# Altium PCB End-Device-v1.0.PcbDoc (part 3 of 4)
Units mil, origin at the board's own origin, x right, y up, seen from the top; angles counter-clockwise.
Board outline 1968.5 x 2440.08 mil, 4 copper layers (Top Layer, Ground, Power, Bottom Layer), stack 61.654 mil thick; 125 components, 76 nets, 388 pads, 715 vias.
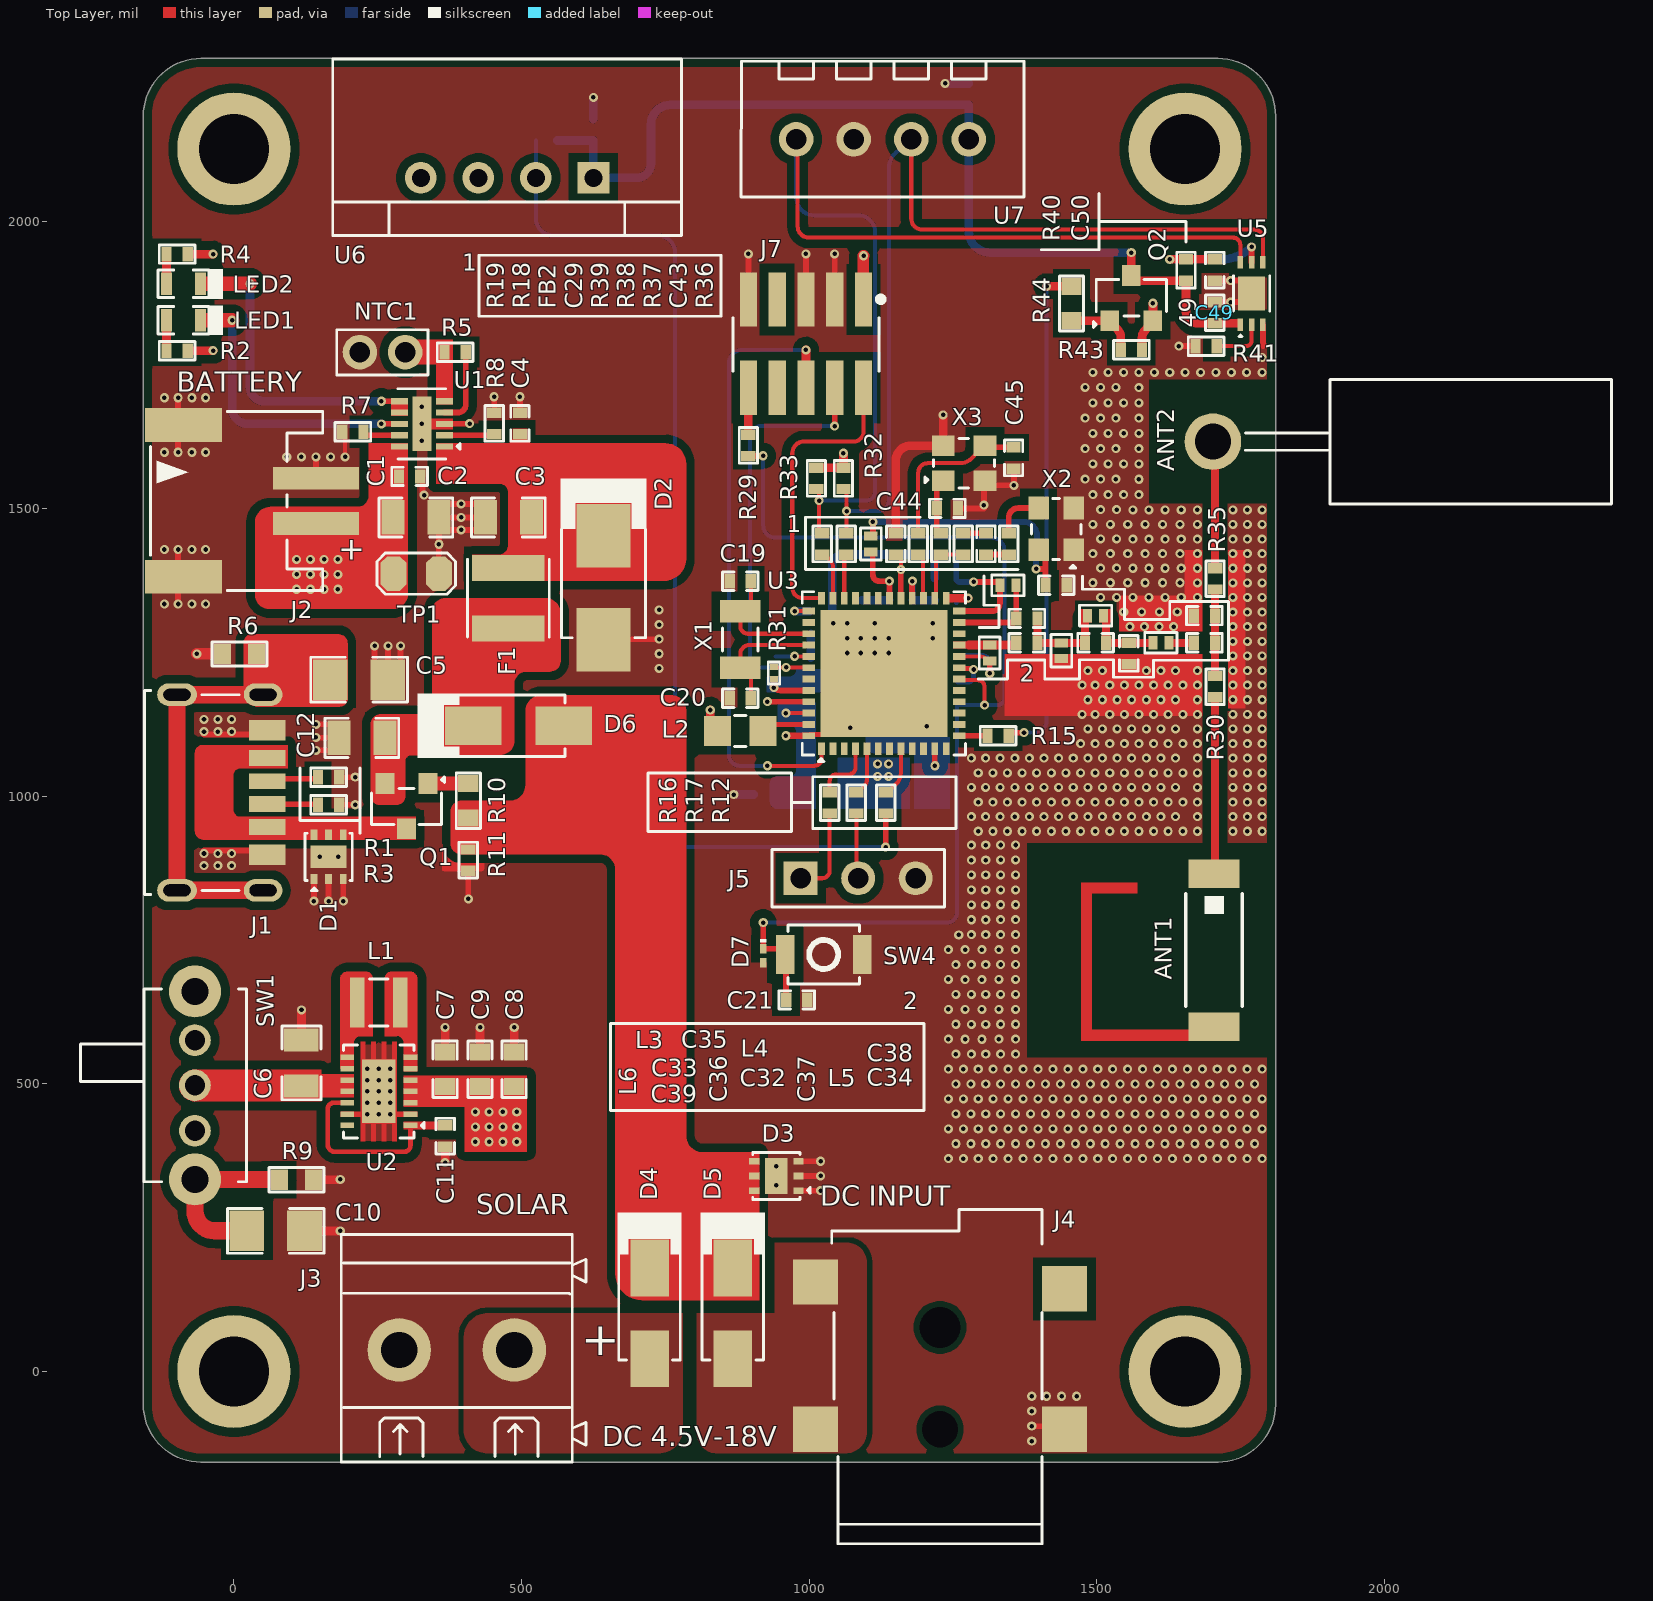
[diagram p0: Top Layer view]

## Part data (continued)
R40 R43: library part RC0402FR-071KL, "RES 1K OHM 1% 1/16W 0402", Case Code (Imperial)=0402, Case Code (Metric)=1005, LCSC Part Number=C106235, Manufacturer=Yageo, Max Operating Temperature=155°C, Max Power Dissipation=63mW, Min Operating Temperature=-55°C, Power Rating=62.5mW, Resistance=1kR, Resistance Tolerance=1%, Resistor Type="Thick Film", Temperature Coefficient=100ppm/°C, Voltage Rating=50V, Case/Package=0402, Category="Chip SMD Resistors", ComponentLink1Description=https://datasheet.ciiva.com/11819/0900766b80c66297-11819477.pdf?src-supplier=RSComponents, ComponentLink1URL=https://datasheet.ciiva.com/11819/0900766b80c66297-11819477.pdf?src-supplier=RSComponents, ComponentLink2Description=https://datasheet.ciiva.com/7983/1018594-7983502.pdf?src-supplier=Element14, ComponentLink2URL=https://datasheet.ciiva.com/7983/1018594-7983502.pdf?src-supplier=Element14, ComponentLink3Description=https://datasheet.ciiva.com/22747/1018594-22747513.pdf?src-supplier=Element14, ComponentLink3URL=https://datasheet.ciiva.com/22747/1018594-22747513.pdf?src-supplier=Element14, ComponentLink4Description=https://datasheet.ciiva.com/12666/pyu-rc0402-51-rohs-l-6-r-12666741.pdf?src-supplier=Mouser, ComponentLink4URL=https://datasheet.ciiva.com/12666/pyu-rc0402-51-rohs-l-6-r-12666741.pdf?src-supplier=Mouser, ComponentLink5Description=https://datasheet.ciiva.com/7849/1018594-7849869.pdf?src-supplier=Element14, ComponentLink5URL=https://datasheet.ciiva.com/7849/1018594-7849869.pdf?src-supplier=Element14, ComponentLink6Description=https://datasheet.ciiva.com/7849/1018594-7849871.pdf?src-supplier=Element14, ComponentLink6URL=https://datasheet.ciiva.com/7849/1018594-7849871.pdf?src-supplier=Element14, ComponentLink7Description=https://datasheet.ciiva.com/17063/pyu-rc0402-51-rohs-l-6-r-17063193.pdf?src-supplier=Future+Electronics, ComponentLink7URL=https://datasheet.ciiva.com/17063/pyu-rc0402-51-rohs-l-6-r-17063193.pdf?src-supplier=Future+Electronics, Construction=Rectangular, Depth=0.5mm, Features="Moisture Resistant", Height=0.32mm, Item Type=Resistor, Lead Free="Lead Free", Length=1mm, Manufacturer Part Number=RC0402FR-071KL, Military Standard=Not, Number of Pins=2, Number of Terminations=2, Packaging="Tape and Reel", Pricing 1="10000=0.00085, 20000=0.00087, 40000=0.00084, 60000=0.00083, 80000=0.00079, 100000=0.00078, 1000000=0.00076 (USD)", Reach SVHC Compliant=Yes, RoHS=Yes, RoHS Compliant=Yes, Series=RC, Size Code=0402, Stock 1=13030000, Supplier 1=Avnet, Supplier Part Number 1=RC0402FR-071KL, Technology="THICK FILM", Termination=SMD/SMT, Tolerance=1%, Voltage Rating (DC)=50V, Width=0.5mm
SW1: "Lying 1A SPDT 9.6mm 8.6mm 24V 3.6mm Black PCPin 10000 Rectangular columnar -25℃~+70℃ Plugin Slide Switches ROHS", LCSC Part Number=C2848877, Manufacturer=G-Switch, Package=Custom, ComponentLink1Description=LCSC, ComponentLink1URL=https://www.lcsc.com/product-detail/Slide-Switches_G-Switch-SK-12D29-G060_C2848877.html, Item Type="Slide Switch", Manufacturer Part Number=SK-12D29-G060
SW4: "SWITCH TACTILE SPST-NO 0.05A 12V", Contact Current Rating=50mA, Contact Resistance=100mR, Insulation Resistance=100MR, LCSC Part Number=C231329, Manufacturer=Omron, Max Operating Temperature=70°C, Max Voltage Rating (DC)=12V, Min Operating Temperature=-25°C, Operating Force=1.5N, Package Quantity=1, Ratings="Dust Proof,IP40", Supplier Part Number 1=SW1020DKR-ND, Actuator Length=0.4mm, Actuator Type=Standard, ComponentLink1Description=http://www.farnell.com/datasheets/60838.pdf?src-supplier=Farnell, ComponentLink1URL=http://www.farnell.com/datasheets/60838.pdf?src-supplier=Farnell, ComponentLink2Description=http://www.farnell.com/datasheets/60838.pdf?src-supplier=Element14, ComponentLink2URL=http://www.farnell.com/datasheets/60838.pdf?src-supplier=Element14, ComponentLink3Description=https://omronfs.omron.com/en_US/ecb/products/pdf/en-b3u.pdf?src-supplier=Digi-Key, ComponentLink3URL=https://omronfs.omron.com/en_US/ecb/products/pdf/en-b3u.pdf?src-supplier=Digi-Key, ComponentLink4Description=http://www.omron.com/ecb/products/pdf/en-b3u.pdf?src-supplier=Digi-Key, ComponentLink4URL=http://www.omron.com/ecb/products/pdf/en-b3u.pdf?src-supplier=Digi-Key, ComponentLink5Description=https://www.distrelec.biz/Web/Downloads/he/et/B3U_eng_datasheet.pdf?mime=application%2Fpdf&src-supplier=Distrelec, ComponentLink5URL=https://www.distrelec.biz/Web/Downloads/he/et/B3U_eng_datasheet.pdf?mime=application%2Fpdf&src-supplier=Distrelec, ComponentLink6Description=http://www.onlinecomponents.com/productFiles/mf-OM/en-b3u.pdf?src-supplier=Onlinecomponents.com, ComponentLink6URL=http://www.onlinecomponents.com/productFiles/mf-OM/en-b3u.pdf?src-supplier=Onlinecomponents.com, ComponentLink7Description=https://www.verical.com/server-webapp/html/getDatasheet?partID=552554&src-supplier=Verical, ComponentLink7URL=https://www.verical.com/server-webapp/html/getDatasheet?partID=552554&src-supplier=Verical, ComponentLink8Description=http://www.farnell.com/datasheets/1685550.pdf?src-supplier=Element14, ComponentLink8URL=http://www.farnell.com/datasheets/1685550.pdf?src-supplier=Element14, ComponentLink9Description=http://www.farnell.com/datasheets/2610940.pdf?src-supplier=Farnell, ComponentLink9URL=http://www.farnell.com/datasheets/2610940.pdf?src-supplier=Farnell, ComponentLink10Description=https://www.alliedelec.com/m/d/4c8a9ef82804fc3c241a13c1e298fd73.pdf?src-supplier=Allied+Electronics, ComponentLink10URL=https://www.alliedelec.com/m/d/4c8a9ef82804fc3c241a13c1e298fd73.pdf?src-supplier=Allied+Electronics, Contact Material=Silver, Current Rating=50mA, Depth=2.5mm, Electrical Life=200000Cycles, Height=1.2mm, Illumination Type=Non-Illuminated,Illuminated, Item Type=Switch, Lead Free="Lead Free", Length=4mm, Manufacturer Part Number=B3U-1000P, Max Current Rating=50mA, Mechanical Life=200000Cycles, Mount="Surface Mount", Orientation=Straight, Packaging="Tape and Reel", Pricing 1="1=1, 10=0.961, 25=0.9064, 50=0.7976, 100=0.7251, 250=0.68888, 500=0.67074, 1000=0.52571 (USD)", REACH SVHC=Unknown, Stock 1=116454, Supplier 1=Digi-Key, Switch Function=Off-Mom, Switch Travel=0.15mm, Termination=SMD/SMT, Throw Configuration=SPST, Voltage Rating (DC)=12V, Weight=0.000776oz, Width=3mm
TP1: "Wire Connecting Pad", Item Type="Test Point", Manufacturer Part Number="2 Test Pad"
U1: "IC BATT CHG LI-ION 1CELL 10WSON", LCSC Part Number=C524795, Manufacturer="Texas Instruments", ComponentLink1Description=https://datasheet.ciiva.com/4874/slusa76a-128668-4874253.pdf?src-supplier=Mouser, ComponentLink1URL=https://datasheet.ciiva.com/4874/slusa76a-128668-4874253.pdf?src-supplier=Mouser, ComponentLink2Description=https://datasheet.ciiva.com/15223/getdatasheetpartid-517676-15223141.pdf?src-supplier=Verical, ComponentLink2URL=https://datasheet.ciiva.com/15223/getdatasheetpartid-517676-15223141.pdf?src-supplier=Verical, ComponentLink3Description=https://datasheet.ciiva.com/1934/bq24210-1934532.pdf?src-supplier=Digikey, ComponentLink3URL=https://datasheet.ciiva.com/1934/bq24210-1934532.pdf?src-supplier=Digikey, Item Type=IC, Manufacturer Part Number=BQ24210DQCR, Pricing="1=2.67, 10=1.99, 50=1.82, 100=1.64, 1000=1.45, 10000=1.31 (USD)", RoHS=Yes, Stock=11128, Supplier=Mouser
U2: "IC REG BUCK BST 3.3V 3.5A 14VSON", Case/Package=VSON, LCSC Part Number=C202140, Manufacturer="Texas Instruments", Max Operating Temperature=85°C, Max Output current=3A, Max Supply Voltage=5.5V, Min Input Voltage=1.8V, Min Operating Temperature=-40°C, Output Voltage=3.3V, Package Quantity=1, Quiescent Current=50uA, Switching Frequency=2.4MHz, ComponentLink1Description=https://datasheet.ciiva.com/2026/tps63021-2026362.pdf?src-supplier=Digikey, ComponentLink1URL=https://datasheet.ciiva.com/2026/tps63021-2026362.pdf?src-supplier=Digikey, ComponentLink2Description=https://datasheet.ciiva.com/2026/tps63021-2026361.pdf?src-supplier=Digikey, ComponentLink2URL=https://datasheet.ciiva.com/2026/tps63021-2026361.pdf?src-supplier=Digikey, ComponentLink3Description=https://datasheet.ciiva.com/2026/tps63021-2026363.pdf?src-supplier=Digikey, ComponentLink3URL=https://datasheet.ciiva.com/2026/tps63021-2026363.pdf?src-supplier=Digikey, ComponentLink4Description=https://datasheet.ciiva.com/3221/tps63020-3221510.pdf?src-supplier=Avnet, ComponentLink4URL=https://datasheet.ciiva.com/3221/tps63020-3221510.pdf?src-supplier=Avnet, Efficiency=96%, Item Type=IC, Lead Free="Lead Free", Manufacturer Part Number=TPS63021DSJR, Mounting Technology="Surface Mount", Number of Outputs=1, Operating Supply Voltage=5.5V, Output Current=3A, Output Type=Fixed, Packaging="Cut Tape", Pins=14, Pricing="1=2.63, 10=1.96, 50=1.8, 100=1.61, 1000=1.43, 10000=1.35 (USD)", Reach SVHC Compliant=No, RoHS=Yes, RoHS Compliant=Yes, Series=-, Stock=4678, Supplier=Mouser, Synchronous Rectifier=Yes
U3: "IC RF TXRX+MCU ISM<1GHZ 48UFQFPN", Frequency=48MHz, LCSC Part Number=C1121847, Manufacturer=STMicroelectronics, Max Operating Temperature=85°C, Max Supply Voltage=3.6V, Min Operating Temperature=-40°C, Min Supply Voltage=1.8V, Nominal Supply Current=31nA, Core Architecture=6081CoreArchitecture, Density=128KB, Item Type=IC, Manufacturer Part Number=STM32WLE5CBU6, Number of A/D Converters=1NUMBER, Number of Channels=12NUMBER, Number of D/A Converters=1NUMBER, Number of I2C Channels=3NUMBER, Number of I/Os=29NUMBER, Number of SPI Channels=2NUMBER, Number of Timers/Counters=1NUMBER, Number of UART Channels=1NUMBER, Pricing="1=3.071 (USD)", RAM Size=48KB, RoHS=No, Stock=1358, Supplier="Arrow Electronics"
U5: "SENSOR OPT 560NM AMBIENT 6WSOF", Case/Package=SMD/SMT, LCSC Part Number=C78960, Manufacturer=Rohm, Max Operating Temperature=85°C, Max Power Dissipation=260mW, Max Supply Voltage=3.6V, Min Operating Temperature=-40°C, Min Supply Voltage=2.7V, Operating Supply Current=120uA, Package Quantity=3000, ComponentLink1Description=https://datasheet.ciiva.com/4697/bh1750fvi-e-186247-4697237.pdf?src-supplier=Mouser, ComponentLink1URL=https://datasheet.ciiva.com/4697/bh1750fvi-e-186247-4697237.pdf?src-supplier=Mouser, ComponentLink2Description=https://datasheet.ciiva.com/15098/getdatasheetpartid-451213-15098956.pdf?src-supplier=Verical, ComponentLink2URL=https://datasheet.ciiva.com/15098/getdatasheetpartid-451213-15098956.pdf?src-supplier=Verical, ComponentLink3Description=https://datasheet.ciiva.com/2819/bh1750fvi-e-2819308.pdf?src-supplier=Digikey, ComponentLink3URL=https://datasheet.ciiva.com/2819/bh1750fvi-e-2819308.pdf?src-supplier=Digikey, ComponentLink4Description=https://datasheet.ciiva.com/2819/bh1750fvi-e-2819309.pdf?src-supplier=Digikey, ComponentLink4URL=https://datasheet.ciiva.com/2819/bh1750fvi-e-2819309.pdf?src-supplier=Digikey, ComponentLink5Description=https://datasheet.ciiva.com/2819/bh1750fvi-e-2819310.pdf?src-supplier=Digikey, ComponentLink5URL=https://datasheet.ciiva.com/2819/bh1750fvi-e-2819310.pdf?src-supplier=Digikey, Contact Plating=Copper,Tin, Height=0.75mm, Interface=I2C,Serial, Item Type=IC, Lead Free="Lead Free", Length=3mm, Manufacturer Part Number=BH1750FVI-TR, Mounting Technology="Surface Mount", Output Type="I2C,Digital,DIGITAL OUTPUT", Packaging="Tape and Reel", Pins=6, Pricing="1=3.29, 5=2.934, 10=2.804, 25=2.648, 50=2.542, 100=2.4447, 500=2.24896, 1000=2.18484 (USD)", Reach SVHC Compliant=Unknown, RoHS=Yes, RoHS Compliant=Yes, Series=-, Stock=3772, Supplier=Digikey, Type="Integrated Circuit (IC)", Wavelength=560nm, Width=1.8mm
U6: "SIP-4 Temperature and Humidity Sensor ROHS", LCSC Part Number=C83988, Manufacturer="Aosong (Guangzhou) Elec", Package=SIP-4, ComponentLink1Description=LCSC, ComponentLink1URL=https://lcsc.com/product-detail/Temperature-and-Humidity-Sensor_Aosong-Guangzhou-Elec-AM2302_C83988.html?s_z=n_am2302, Item Type=Sensor, Manufacturer Part Number=AM2302
U7: "SIP-4 Gas Sensors ROHS", LCSC Part Number=C3012633, Manufacturer="Aosong (Guangzhou) Elec", Package=SIP-4, ComponentLink1Description=LCSC, ComponentLink1URL=https://lcsc.com/product-detail/Gas-Sensors_Aosong-Guangzhou-Elec-AGS02MA_C3012633.html?s_z=n_AGS02MA%2520, Item Type=Sensor, Manufacturer Part Number=AGS02MA
X1: library part NX3215SA-32.768K-STD-MUA-14, "CRYSTAL 32.7680KHZ 6PF SMD", Case/Package=SMD/SMT, ESR (Equivalent Series Resistance)=70kR, Frequency=32.768kHz, Frequency Tolerance=20ppm, LCSC Part Number=C156244, Load Capacitance=6pF, Manufacturer=NDK, Max Operating Temperature=85°C, Min Operating Temperature=-40°C, Supplier Part Number 1=1847854, Category=Crystals, ComponentLink1Description=https://datasheet.ciiva.com/6733/c-nx3215sa-std-mua-9-e-6733110.pdf?src-supplier=Digi-Key, ComponentLink1URL=https://datasheet.ciiva.com/6733/c-nx3215sa-std-mua-9-e-6733110.pdf?src-supplier=Digi-Key, ComponentLink2Description=https://datasheet.ciiva.com/6733/c-nx3215sa-std-mua-9-e-6733111.pdf?src-supplier=Digi-Key, ComponentLink2URL=https://datasheet.ciiva.com/6733/c-nx3215sa-std-mua-9-e-6733111.pdf?src-supplier=Digi-Key, ComponentLink3Description=https://datasheet.ciiva.com/6733/c-nx3215sa-std-mua-9-e-6733112.pdf?src-supplier=Digi-Key, ComponentLink3URL=https://datasheet.ciiva.com/6733/c-nx3215sa-std-mua-9-e-6733112.pdf?src-supplier=Digi-Key, Item Type=Crystal, Manufacturer Part Number=NX3215SA-32.768K-STD-MUA-14, Mounting Technology="Surface Mount", Packaging="Cut Tape", Pricing 1="5=0.15520, 50=0.68600, 100=0.66600, 250=0.65000, 500=0.63400 (GBP)", RoHS=Yes, RoHS Compliant=Yes, Series=NX3215SA, Stock 1=500, Supplier 1=Rs
X2: library part ECS-TXO-25CSMV-320-DY-TR, "XTAL OSC TCXO 32.0000MHZ CLPSNW", LCSC Part Number=C2594515, Manufacturer="ECS International", Item Type=Oscillators, Manufacturer Part Number=ECS-TXO-25CSMV-320-DY-TR, Pricing="1=2, 10=1.739, 50=1.5762, 100=1.5109, 500=1.46514 (USD)", RoHS=Yes, Stock=17100, Supplier=Digikey
X3: library part ECS-320-8-36B-CKY-TR, "CRYSTAL 32.0000MHZ 8PF SMD", LCSC Part Number=C7183282, Manufacturer="ECS International", ComponentLink1Description=https://ecsxtal.com/store/pdf/ECX-2236B.pdf?src-supplier=Digikey, ComponentLink1URL=https://ecsxtal.com/store/pdf/ECX-2236B.pdf?src-supplier=Digikey, Item Type=Crystal, Manufacturer Part Number=ECS-320-8-36B-CKY-TR, Pricing="1=0.35, 10=0.301, 50=0.2636, 100=0.2461, 500=0.2369 (USD)", RoHS=Yes, Stock=66698, Supplier=Digikey

## Free pads (board coordinates)
  round 196.85 hole 122.05: MH(0,0) MH(0,2125.12) MH(1653.55,0) MH(1653.55,2125.12)

## Via types
v1: diameter 15.75, hole 7.87, Top Layer to Bottom Layer, tented both sides, 712 vias
v2: diameter 15.75, hole 7.87, Top Layer to Bottom Layer, 3 vias

## Nets (pads, with @x,y where several pads share a name; then routed paths per layer and width w, separated by ;. In a path a pad name is that pad's centre, name@x,y a point inside that pad or via, vN(x,y) a via of type N, cw(c..) or ccw(c..) an arc to the next point about the centre after c; other vN are vias at no path point)
3V3: C7.2 C8.2 C9.2 Q2.2 R27.1 R28.1 R43.1 U2.3 U2.4 U2.5 | length 87.2
  Top Layer w15.33: R43.1@1578.66,1776.09 1578.66,1796.69 cw(c1597.56,1796.69) 1582.88,1808.6 1589.08,1816.24 Q2.2@1597.56,1826.68 v1(1597.56,1857.06)
  other v1: 419.78,399.46 443.78,399.46 467.78,399.46 491.78,399.46 419.78,425.46 443.78,425.46 467.78,425.46 491.78,425.46 419.78,451.46 443.78,451.46 467.78,451.46 491.78,451.46 1119.09,1034.48 1138.09,1034.48 1119.09,1056.48 1138.09,1056.48
3V3-SW: C47.2 C48.2 C49.2 Q2.3 R40.2 R42.1 U5.1 U6.1 U7.1 | length 1701.9
  Top Layer w15: v2(1560,1945) 1560.16,1945 Q2.3@1560.16,1905.42 ccw(c1569.25,1905.42) 1569.25,1896.33 R40.2@1655.16,1896.33 1655.16,1841.76 ccw(c1674.86,1841.76) 1674.86,1822.06 C49.2@1705.16,1822.06 U5.1@1745.73,1822.06
  Bottom Layer w15: R42.1@562,2140 C47.2@625,2140 U6.1@625,2075 700,2075 ccw(c700,2100) 725,2100 725,2168 cw(c759,2168) 759,2202 C48.2@1277.5,2202 U7.1@1277.5,2142 1277.5,1982.5 ccw(c1315,1982.5) 1315,1945 v2(1560,1945)
DATA_AM2302: R12.1 R42.2 U6.2 | length 1863.3
  Top Layer w10: v1(1133.12,911.49) R12.1@1133.15,970.12
  Bottom Layer w7: R42.2@525,2140 525,2005 ccw(c555.1,2005) 555.1,1974.9 736.8,1974.9 cw(c736.8,1944.7) 767,1944.7 767,925.74 ccw(c781.25,925.74) 781.25,911.49 v1(1133.12,911.49)
DC-IN: D3.4 D3.5 D3.6 D4.1 D5.1 D6.2 R10.1 R11.2